# Altium PCB J-Link Cortex with VCOM Adapter.PcbDoc
Units mil, origin at the board's own origin, x right, y up, seen from the top; angles counter-clockwise.
Board outline 1320 x 990 mil, 2 copper layers (Top Layer, Bottom Layer), stack 61.756 mil thick; 23 components, 22 nets, 104 pads, 35 vias.
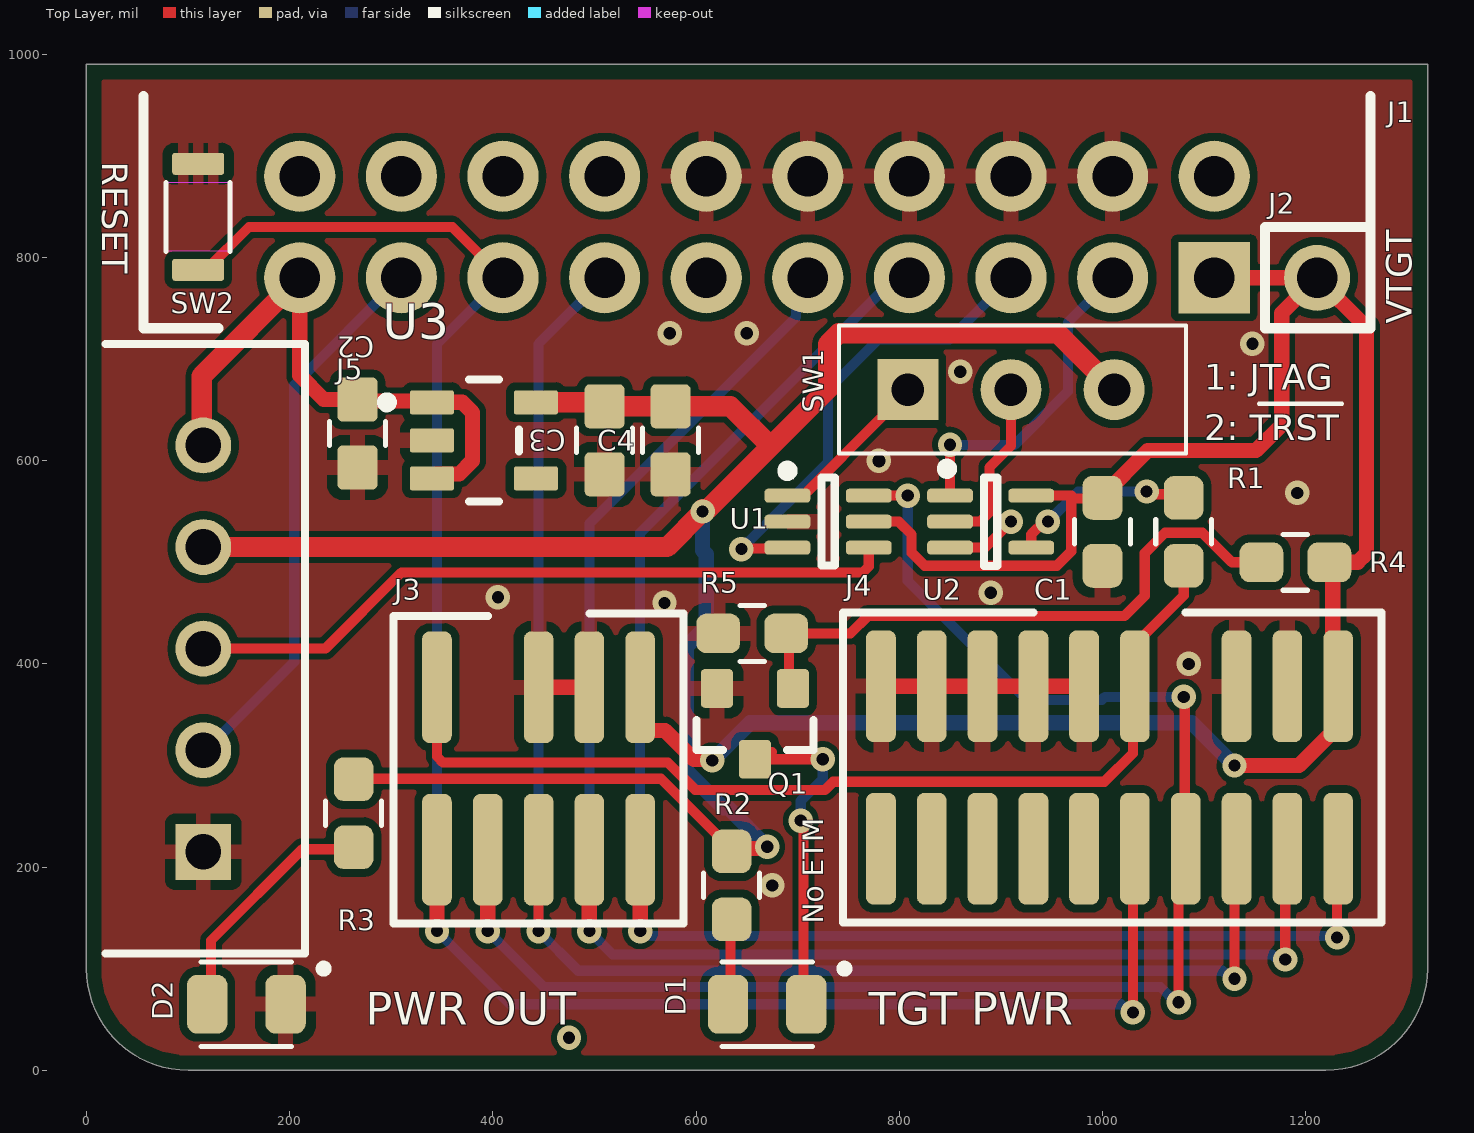
[diagram p0: Top Layer view]
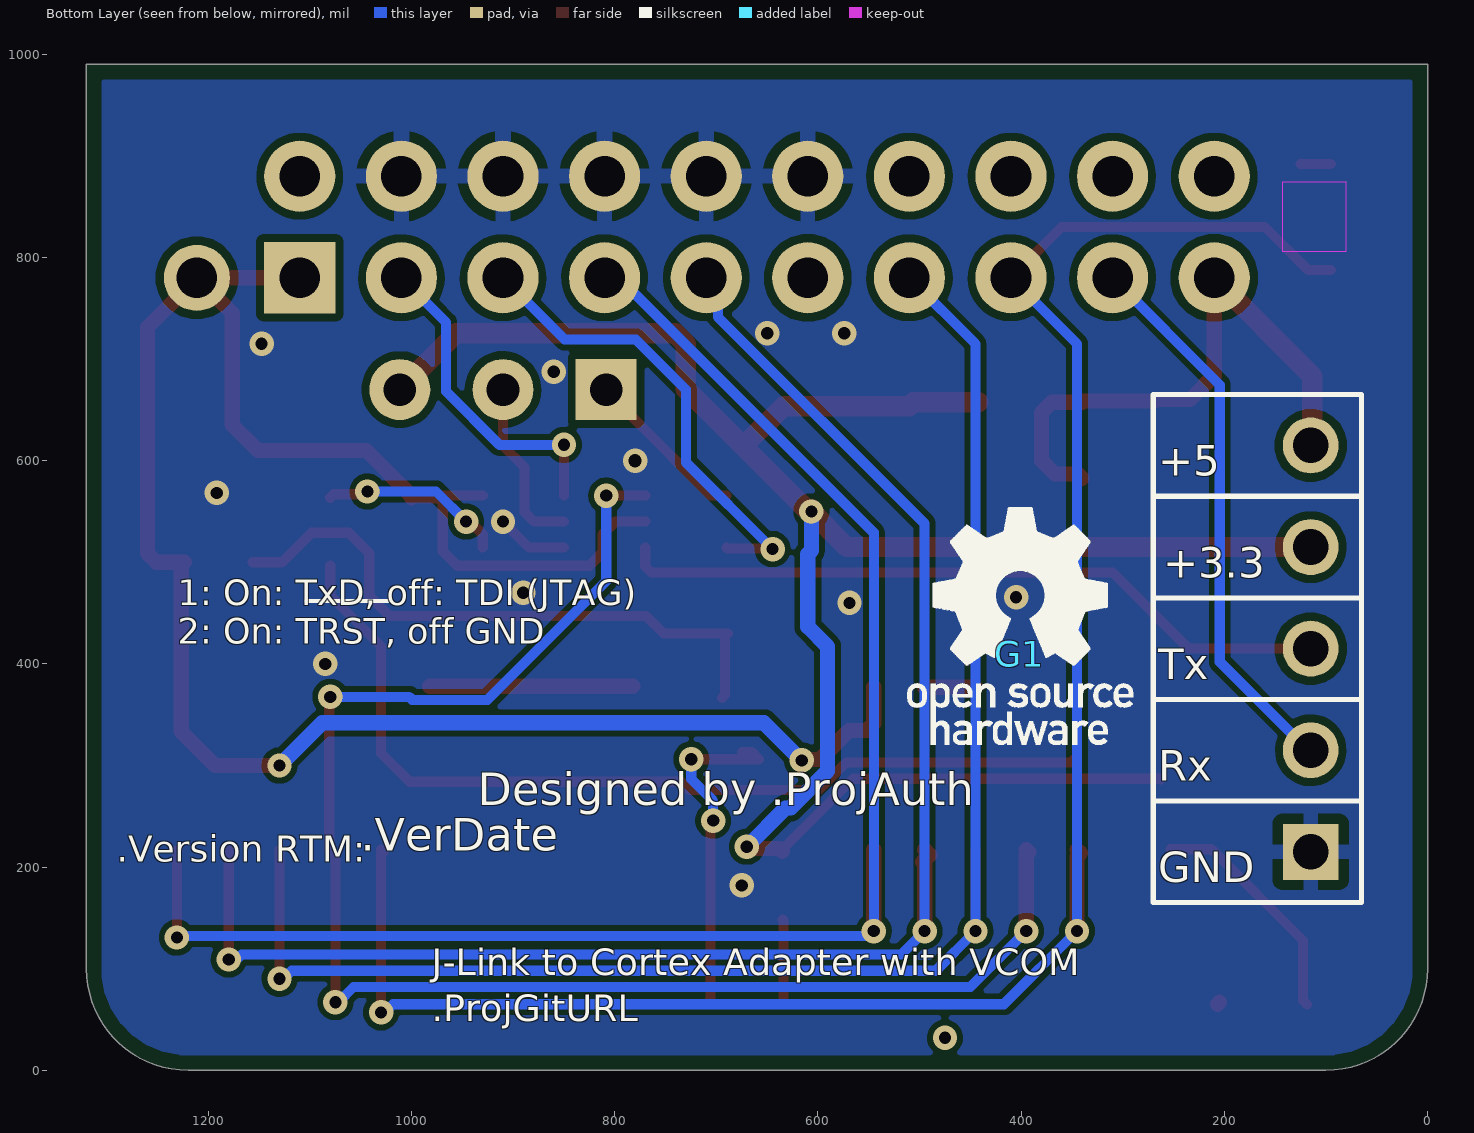
[diagram p1: Bottom Layer view, seen from below]
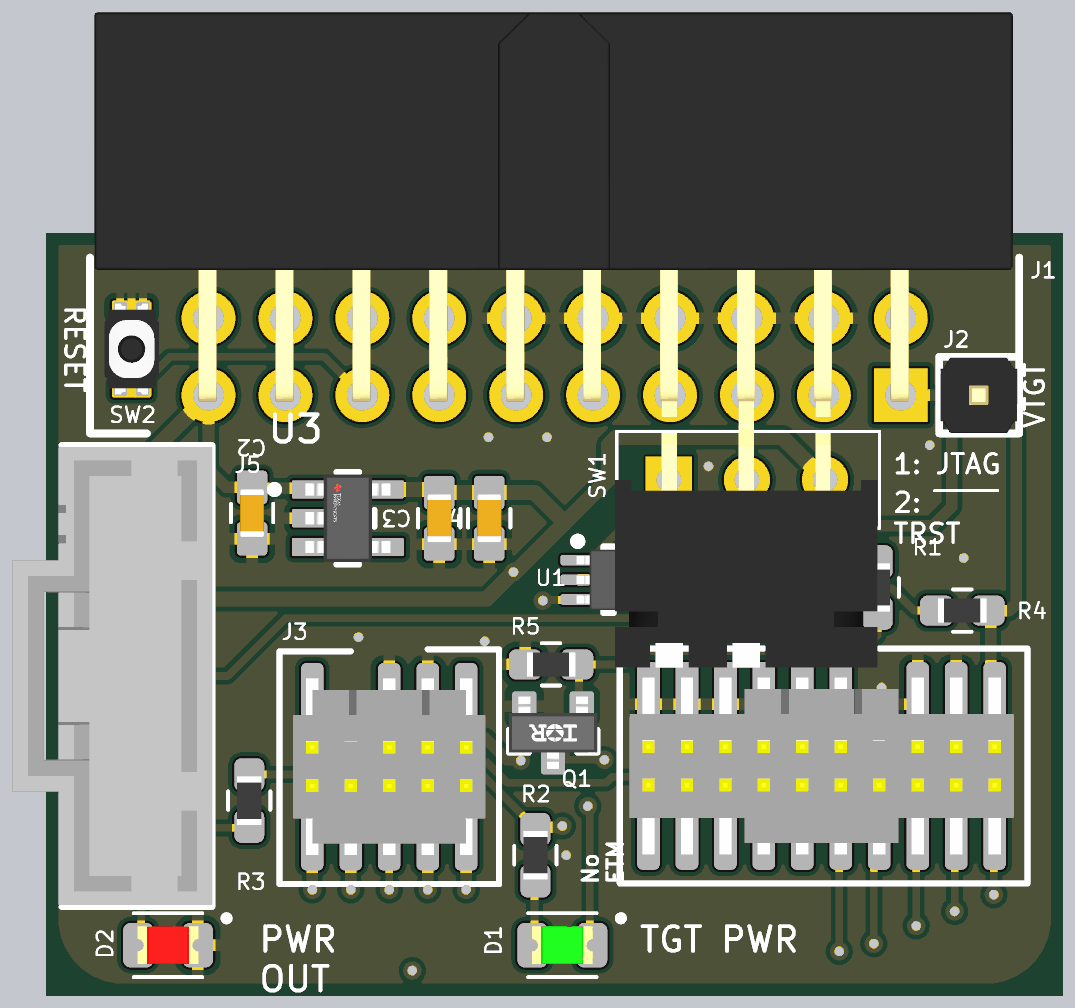
[diagram p2: 3D render of the assembled board from above, using the file's embedded part models]

## Layer stack, top to bottom
Top Solder: solder mask 1, PSR-4000BN, Dk 4.5
Top Layer: signal copper 1.378
Dielectric 1: core 59, Kingboard KB6167F, Dk 4.5
Bottom Layer: signal copper 1.378
Bottom Solder: solder mask 1, PSR-4000BN, Dk 4.5

## Board outline
0,100 ccw(c100,100) 100,0 300.72,0 1220,0 ccw(c1220,100) 1320,100 1320,990 0,990

## Design rules (kind name [scope] priority, off if disabled: settings)
AcuteAngle [All] p1: minimum=6.00000000000000E+0001 checktracksonly=FALSE
BoardOutlineClearance [All] p1: gap=15 ignorepadtopadclearanceinfootprint=FALSE
Clearance [All] p1: gap=6 ignorepadtopadclearanceinfootprint=FALSE except(8: SMDPad-Poly THPad-Poly; 12: Arc-Hole Track-Hole SMDPad-Hole THPad-Hole Via-Hole Fill-Hole Poly-Hole Region-Hole Text-Hole)
ComponentClearance [All] p1: gap=5 collisioncheckmode=3 verticalgap=5 showdistances=TRUE
Creepage [All] p1: checkdistance=3 ignoreinternallayers=FALSE
DiffPairsRouting [All] p1: maxlimit=10 minlimit=5 mostfreqgap=5 toplayer_minwidth=5 toplayer_maxwidth=1000 toplayer_prefwidth=5 bottomlayer_minwidth=5 bottomlayer_maxwidth=1000 bottomlayer_prefwidth=5 maxuncoupledlength=500
Height [All] p1: minheight=0 maxheight=71497.94 prefheight=500
HoleSize [All] p1: absolutevalues=TRUE maxlimit=248.03 minlimit=10 maxpercent=80.000 minpercent=20.000
HoleToHoleClearance [All] p1: gap=9.84 allowstackedmicrovias=FALSE
MinimumAnnularRing [All] p1: minimumring=3
MinimumSolderMaskSliver MinimumSolderMaskSliver_1 [All] p1: minsoldermaskwidth=0
MinimumSolderMaskSliver [HasFootprint('EVP-BB2A9B000 LOW DENSITY') vs HasFootprint('EVP-BB2A9B000 LOW DENSITY')] p2: minsoldermaskwidth=0
PasteMaskExpansion "THT Paste" [IsThruPin or IsThruVia or IsVia] p1: expansion=-99999 usepaste=FALSE
PasteMaskExpansion [All] p2: expansion=0
PlaneClearance [All] p1: clearance=5
PlaneConnect PlaneConnectPowerPads [InPadClass('PowerPads')] p1: planeconnectstyle=Direct reliefexpansion=20 reliefentries=4 reliefconductorwidth=10 reliefairgap=10
PlaneConnect [All] p2: pad.planeconnectstyle=Relief pad.reliefexpansion=11.81 pad.reliefentries=4 pad.reliefconductorwidth=5 pad.reliefairgap=5 via.planeconnectstyle=Direct via.reliefexpansion=11.81 via.reliefentries=4 via.reliefconductorwidth=5 via.reliefairgap=5
PolygonConnect PolygonConnectPowerPads [All vs InPolygonClass('PWRPLY')] p1: thpad.connectstyle=Relief thpad.reliefconductorwidth=15 thpad.reliefentries=4 thpad.polygonreliefangle="90 Angle" thpad.airgapwidth=10 smdpad.connectstyle=Relief smdpad.reliefconductorwidth=15 smdpad.reliefentries=4 smdpad.polygonreliefangle="90 Angle" smdpad.airgapwidth=10 via.connectstyle=Direct via.reliefconductorwidth=10 via.reliefentries=4 via.polygonreliefangle="90 Angle" via.airgapwidth=10
PolygonConnect [All] p2: thpad.connectstyle=Relief thpad.reliefconductorwidth=8 thpad.reliefentries=4 thpad.polygonreliefangle="90 Angle" thpad.airgapwidth=8 smdpad.connectstyle=Relief smdpad.reliefconductorwidth=5 smdpad.reliefentries=4 smdpad.polygonreliefangle="90 Angle" smdpad.airgapwidth=5 via.connectstyle=Direct via.reliefconductorwidth=5 via.reliefentries=4 via.polygonreliefangle="90 Angle" via.airgapwidth=5
RoutingCorners [All] p1: cornerstyle=45-Degree minsetback=250 maxsetback=100
RoutingVias [All] p1: holewidth=12 width=24 viastyle="Through Hole" minholewidth=10 minwidth=20 maxholewidth=23.62 maxwidth=259.84
SilkToSilkClearance [All] p1: silktosilkclearance=3
SilkToSolderMaskClearance [IsPad or IsVia] p1: minsilkscreentomaskgap=3 clearancetoexposedcopper=FALSE
SolderMaskExpansion TentedVias [IsVia] p1: expansion=4 istentingtop=TRUE
SolderMaskExpansion [All] p2: expansion=3 istentingtop=FALSE
SupplyNets "Schematic Supply Nets_3" [InNet('+5')] p1: voltage=0.000
SupplyNets "Schematic Supply Nets_2" [InNet('VREF_TGT')] p2: voltage=0.000
SupplyNets "Schematic Supply Nets_1" [InNet('+3.3')] p3: voltage=0.000
SupplyNets "Schematic Supply Nets" [InNet('GND')] p4: voltage=0.000
UnRoutedNet [All] p1: checkbadconnections=TRUE
Width PWRWIDTH [InNetClass('PWR')] p1: maxlimit=40 minlimit=10 preferedwidth=15 minimp=50.000000 maximp=50.000000 favimp=50.000000
Width [All] p2: maxlimit=1000 minlimit=6 preferedwidth=10 minimp=50.000000 maximp=50.000000 favimp=50.000000
17 further rules are at their usual default settings.

## Classes and differential pairs
polygon class PWRPLY: BOTGND TOPGND
net class PWR: +3.3 +5 GND

## Components (designator, comment, footprint, x,y, rotation, side; value= is the part's Value field where it differs from the comment)
C1 "CAP 0603 0.1UF 16V 10% X7R" 0603_CAP#1 1000,530 r270 top value=0.1UF
C2 "CAP 0603 1UF 50V 10% X7R" 0603_CAP#2 266.73,626.76 r90 top value=1µF
C3 "CAP 0603 1UF 50V 10% X7R" 0603_CAP#2 510,620 r90 top value=1µF
C4 "CAP 0603 1UF 50V 10% X7R" 0603_CAP#2 575,620 r90 top value=1µF
D1 "Green LED" SM0805GCL 670,65 r180 top
D2 "Red LED" SM0805HCL 157.4,65 r180 top
G1 "Comment" OSHW_.25in 401.62,410 r180 bottom
J1 "20 contact Female header, RA" SFH11-PBPC-D10-RA-BK 660,1110.31 r180 top locked
J2 "1 contacts Male header" "PH1-01-UA round pad with connector" 1211.3,780 r0 top
J3 "Cortex Debug, 0.050\" 10 Pin" "FTSH-105-01-F-DV-007-K PLUGOUT" 445,297.01 r180 top
J4 "Cortex Debug+ETM Connector, 0.050\" 20 Pin" "FTSH-110-01-F-DV-007-K plugout" 1007,298 r180 top
J5 "5-104363-4" 5-104363-4-Footprint-1 115,415 r90 top
Q1 "IRLML0040TRPBF" SOT95P237X112-3N-2-V 658,341 r270 top
R1 "RES 0603 10K 1%" 0603_RES 1080,530 r90 top value=10K
R2 "RES 0603 680 1%" 0603_RES 635,182.01 r90 top value=680
R3 "RES 0603 680 1%" 0603_RES 263,253.01 r90 top value=680
R4 "RES 0603 1K 1%" 0603_RES 1190,500 r180 top value=1K
R5 "RES 0603 10K 1%" 0603_RES 655.31,430 r0 top value=10K
SW1 "SWITCH SLIDE DIP SPST 10MA 20V" SPA02B 910,670 r0 top
SW2 "SWITCH TACTILE SPST-NO 0.02A 15V" "EVP-BB2A9B000 LOW DENSITY" 110,840 r90 top
U1 "Demultiplexer" SOT363 730,540 r0 top
U2 "Single AND Gate" SOT353 890,540 r0 top
U3 "TLV75533PDBVR" FP-DBV0005A-MFG 391.18,620 r0 top

## Footprints (in the part's own frame and the unit in brackets; to place one, negate y for a bottom-side part, rotate by r counter-clockwise, add the part's x,y. Pads: shape width x height; smd on the part's side, far side on the other; paste and mask are expansions set on the pad)
5-104363-4-Footprint-1 [mm]
  rect 1.398x1.398 hole 0.89: 1(-5.08,0)
  round 1.398 hole 0.89: 2(-2.54,0) 3(0,0) 4(2.54,0) 5(5.08,0)
  silkscreen extent -7.62,-2.54 7.62,2.44, body extent -7.56,-2.54 7.56,4.06, height 13.59
0603_CAP#1 [mm]
  rrect50% 1.1x1 smd: 1(-0.85,0) 2(0.85,0)
  silkscreen extent -0.3,-0.7 0.3,0.7, body extent -0.8,-0.4 0.8,0.4, height 0.6
0603_CAP#2 [mm]
  rrect25% 1.1x1 smd: 1(-0.85,0) 2(0.85,0)
  silkscreen extent -0.3,-0.7 0.3,0.7, body extent -0.8,-0.4 0.8,0.4, height 0.6
0603_RES [mil]
  rrect50% 43x39 smd: 1(-33.46,0) 2(33.46,0)
  silkscreen extent -12,-28 12,28, body extent -31,-16 32,16, height 24
"EVP-BB2A9B000 LOW DENSITY" [mm]
  rrect25% 0.55x0.55 smd paste-0.05: 1(-1.325,-0.375) 1(-1.325,0.375) 2(1.325,-0.375) 2(1.325,0.375)
  rrect25% 0.55x0.55 smd paste-999: 1(-1.325,0) 2(1.325,0)
  Keep-Out Layer region: 0.864,-0.84 -0.864,-0.84 -0.864,0.762 0.864,0.762
  silkscreen extent -0.86,-0.8 0.86,0.8, body extent -1.5,-0.9 1.5,0.9, height 0.54
FP-DBV0005A-MFG [mm]
  rrect17% 1.1x0.6 smd: 1(-1.3,0.95) 2(-1.3,0) 3(-1.3,-0.95) 4(1.3,-0.95) 5(1.3,0.95)
  silkscreen extent -2.55,-1.53 0.87,1.52, body extent -1.4,-1.45 1.4,1.45, height 1.45
"FTSH-105-01-F-DV-007-K PLUGOUT" [mil]
  rrect50% 29.13x109.84 smd: 1(-100,-80) 2(-100,80) 3(-50,-80) 4(-50,80) 5(0,-80) 6(0,80) 8(50,80) 9(100,-80) 10(100,80)
  silkscreen extent -143,-153 143,153, body extent -207,-115 207,310, height 315
"FTSH-110-01-F-DV-007-K plugout" [mil]
  rrect50% 29.13x109.84 smd: 1(-225,-80) 2(-225,80) 3(-175,-80) 4(-175,80) 5(-125,-80) 6(-125,80) 8(-75,80) 9(-25,-80) 10(-25,80)
  rrect50% 29.5x109.84 smd: 11(25,-80) 12(25,80) 13(75,-80) 14(75,80) 15(125,-80) 16(125,80) 17(175,-80) 18(175,80) 19(225,-80) 20(225,80)
  silkscreen extent -268,-153 262,153, body extent -333,-115 332,310, height 315
OSHW_.25in [mil]
  silkscreen extent -110,-90 112,144
"PH1-01-UA round pad with connector" [mil]
  round 65 hole 40: 1(0,0)
  silkscreen extent -51,-50 53,50, body extent -50,-50 50,50, height 1045
SFH11-PBPC-D10-RA-BK [mil] "CONN HDR 20POS 0.1 GOLD PCB R/A"
  rect 70x70 hole 40 paste-99999: 1(-450,330.31)
  round 70 hole 40 paste-99999: 2(-450,230.31) 3(-350,330.31) 4(-350,230.31) 5(-250,330.31) 6(-250,230.31) 7(-150,330.31) 8(-150,230.31) 9(-50,330.31) 10(-50,230.31) 11(50,330.31) 12(50,230.31) 13(150,330.31) 14(150,230.31) 15(250,330.31) 16(250,230.31) 17(350,330.31) 18(350,230.31) 19(450,330.31) 20(450,230.31)
  silkscreen extent -604,151 604,380, body extent -596,-167 598,338, height 280
SM0805GCL [mm]
  rrect50% 1.01x1.47 smd: A(0.98,0) K(-0.98,0)
  silkscreen extent -2.03,-1.05 1.13,1.05, body extent -1,-0.62 1,0.62, height 1.12
SM0805HCL [mm]
  rrect50% 1.01x1.47 smd: A(0.98,0) K(-0.98,0)
  silkscreen extent -2.03,-1.05 1.13,1.05, body extent -1,-0.62 1,0.62, height 1.12
SOT95P237X112-3N-2-V [mm] "SOT,0.95mm pitch;3 pin,1.30mm W X 2.92mm L X 1.12mm H body"
  rrect25% 0.972x0.802 smd paste+0 mask+0: 1(-0.885,0.95) 2(-0.885,-0.95) 3(0.885,0)
  silkscreen extent -0.1,-1.46 0.65,1.46, body extent -1.2,-1.46 1.2,1.46, height 1.12
SOT353 [mil]
  rrect50% 45x13.78 smd: 1(-40,25.59) 2(-40,0) 3(-40,-25.59) 4(40,-25.59) 5(40,25.59)
  silkscreen extent -48,-44 6,57, body extent -47,-43 47,43, height 43
SOT363 [mil]
  rrect50% 45x13.78 smd: 1(-40,25.59) 2(-40,0) 3(-40,-25.59) 4(40,-25.59) 5(40,0) 6(40,25.59)
  silkscreen extent -45,-43 6,55, body extent -41,-39 41,39, height 39
SPA02B [mil]
  rect 60x60 hole 32: 1(-101.58,0)
  round 60 hole 32: 2(0,0) 3(101.57,0)
  silkscreen extent -169,-63 172,63, body extent -169,-63 172,63, height 244

## Part data
C1: "Capacitor Surface Mount 0603 Footprint 0.1UF 16V 10% Tolerance Ceramic X7R", Manufacturer=Various, PCB Package=0603, Tolerance=10%, Voltage=16V, ComponentLink1Description="Manufacturer Website", ComponentLink2Description="Component Datasheet", ComponentLink3Description="Octopart Link", Description in Visual="Cap SMT 0603 0.1UF 16V 10%  Cer X7R", Manufacturer P/N=Various, P/N="CAP 0603 0.1UF 16V 10% X7R", Type="Ceramic X7R", Val=0.1UF, Vol=16V
C2 C3 C4: library part CMP-011-000287-4, "Capacitor Surface Mount 0603 Footprint 1UF 50V 10% Tolerance Ceramic X7R", Capacitor Type=Ceramic, Case/Package=0603, Manufacturer=Various, Tolerance=10%, Voltage=50V, Description in Visual="Cap SMT 0603 1UF 50V 10% Ceramic X7R", Manufacturer P/N="CAP 0603 1UF 50V 10% X7R", Mount=SMT, P/N="CAP 0603 1UF 50V 10% X7R", PCB Package=0603, RoHS=Yes, Type="Ceramic X7R"
D1: library part SM0805GCL, "Green 574nm LED Indication - Discrete 1.9V 0805 (2012 Metric)", Color=Green, Manufacturer=Bivar, Millicandela Rating=3.6mcd, Package Class="Surface Mount", PCB Package=0805, Test Current=2mA, Voltage Rating=1.9V, ComponentLink1Description="Manufacturer Website", ComponentLink1URL=#https://www.bivar.com/#, ComponentLink2Description="Component Datasheet", ComponentLink2URL=https://www.bivar.com/parts_content/Datasheets/SM0805HCL.pdf, ComponentLink3Description="Octopart Link", ComponentLink3URL=#https://octopart.com/sm0805gcl-bivar-22059573?r=sp#, Configuration=Single, Description in Visual="Green 574nm LED Indication - Discrete 1.9V 0805 (2012 Metric)", Lens Style=Square, Lens Type=Clear, Manufacturer P/N=SM0805GCL, P/N=SM0805GCL, Viewing Angle=130°, Wavelength=574nm
D2: library part SM0805HCL, "Red 631nm LED Indication - Discrete 1.9V 0805 (2012 Metric)", Color=Red, Manufacturer=Bivar, Millicandela Rating=11.5mcd, Package Class="Surface Mount", PCB Package=0805, Test Current=2mA, Voltage Rating=1.9V, ComponentLink1Description="Manufacturer Website", ComponentLink1URL=#https://www.bivar.com/#, ComponentLink2Description="Component Datasheet", ComponentLink2URL=https://www.bivar.com/parts_content/Datasheets/SM0805HCL.pdf, ComponentLink3Description="Octopart Link", ComponentLink3URL=#https://octopart.com/sm0805hcl-bivar-2191581?r=sp#, Configuration=Single, Description in Visual="Red 631nm LED Indication - Discrete 1.9V 0805 (2012 Metric)", Lens Style=Square, Lens Type=Clear, Manufacturer P/N=SM0805HCL, P/N=SM0805HCL, Viewing Angle=130°, Wavelength=631nm
J1: library part SFH11-PBPC-D10-RA-BK, "20 Position Header Connector  Through Hole, Right Angle", Manufacturer=Sullins, PCB Package="2x10 THT", Supplier Part Number 1=S9205-ND, ComponentLink1Description="Manufacturer Website", ComponentLink1URL=https://www.sullinscorp.com/, ComponentLink2Description="Component Datasheet", ComponentLink2URL=https://datasheet.ciiva.com/754/sfh11-pxxc-dxx-ra-xx11161-c-754566.pdf?src-supplier=Digi-Key, Description in Visual="Con Hdr Female 20 contacts horizontal 2X10 keyed", Manufacturer P/N=SFH11-PBPC-D10-RA-BK, Number of Contacts=20, Number of Rows=2, Orientation=horizontal, P/N=SFH11-PBPC-D10-RA-BK, Pitch="0.100\"", Supplier 1=Digi-Key
J2: library part PH1-01-UA, "Connector Male Header 1X1 vertical 1contact 0.100in pitch Gold finish TH", Manufacturer="Adam Tech", PCB Package="NON-STD TH", Supplier Part Number 1=2057-PH1-01-UA-ND, ComponentLink1Description="Manufacturer Website", ComponentLink1URL=http://www.adam-tech.com/, ComponentLink2Description="Component Datasheet", ComponentLink2URL=http://www.adam-tech.com/downloader.php?p=PH1-XX-UA.pdf, ComponentLink3Description="Octopart Link", ComponentLink3URL=https://octopart.com/ph1-01-ua-adam+tech-12701205?r=sp, Contact Finish="Gold Flash", Description in Visual="Con Hdr Male 1contacts vertical 1X1", Gender=Male, Manufacturer P/N=PH1-01-UA, Number of Contacts=1, Number of Rows=1, Orientation=vertical, P/N=PH1-01-UA, Pitch=0.100in, Supplier 1=Digi-Key
J3: library part "ARM Cortex Debug", "10 Pin Shrouded Header, 0.050\", Key Pin 7", Manufacturer=Samtech, Manufacturer P/N=Various, Supplier Part Number 1=SAM15640-ND, ComponentLink1Description="Pinout Reference", ComponentLink1URL=http://infocenter.arm.com/help/topic/com.arm.doc.faqs/attached/13634/cortex_debug_connectors.pdf, ComponentLink2Description="Datasheet for Connector", ComponentLink2URL=http://suddendocs.samtec.com/catalog_english/ftsh_smt.pdf, Contact Finish=Gold, Description in Visual="10 Pin Shrouded Header, 0.050\", Key Pin 7", Gender=Male, Number of Contacts=10, Number of Rows=2, Orientation=Vertical, P/N="ARM Cortex Debug", Pitch="0.050\"", Supplier 1=Digi-Key, Supplier 2=Digi-Key, Supplier 3=Digi-Key, Supplier Part Number 2=SAM13926CT-ND, Supplier Part Number 3=SAM11250-ND
J4: library part "Cortex Debug+ETM", "20 Pin Shrouded Header, 0.050\", Key Pin 7", Manufacturer=Samtech, Manufacturer P/N=Various, Supplier Part Number 1=SAM15422CT-ND, ComponentLink1Description="Pinout Reference", ComponentLink1URL=http://infocenter.arm.com/help/topic/com.arm.doc.faqs/attached/13634/cortex_debug_connectors.pdf, ComponentLink2Description="Datasheet for Connector", ComponentLink2URL=http://suddendocs.samtec.com/catalog_english/ftsh_smt.pdf, Contact Finish=Gold, Description in Visual="20 Pin Shrouded Header, 0.050\", Key Pin 7", Gender=Male, Number of Contacts=20, Number of Rows=2, Orientation=Vertical, P/N="Cortex Debug+ETM", Pitch="0.050\"", Supplier 1=Digi-Key, Supplier 2=Avnet, Supplier 3=Digi-Key, Supplier 4=Avnet, Supplier Part Number 2=FTSH-110-01-F-DV-007-K-TR, Supplier Part Number 3=SAM11264-ND, Supplier Part Number 4=FTSH-110-01-F-DV-007-K-A
J5: library part CMP-00107-1, "Board Connector, 5 Contact(s), 1 Row(s), Male, Straight, 0.1 inch Pitch, Solder Terminal, Locking, Black Insulator, Plug"
Q1: library part CMP-00070-5, "Power Field-Effect Transistor, 3.6A I(D), 40V, 0.056ohm, 1-Element, N-Channel, Silicon, Metal-oxide Semiconductor FET, TO-236AB", Drain Current-Max (Abs) (ID)=3.6A, Drain-source On Resistance-Max=56mR, DS Breakdown Voltage-Min=40V, Max Operating Temperature=150°C, Operating Mode="ENHANCEMENT MODE", Package Body Material=Plastic, Package Shape=Rectangular, Package Style="SMALL OUTLINEMeter", Peak Reflow Temperature (Cel)=260°C, Power Dissipation-Max (Abs)=1.3W, Pulsed Drain Current-Max (IDM)=15A, Time @ Peak Reflow Temperature-Max (s)=30s, Additional Feature="HIGH RELIABILITY", Drain Current-Max (ID)=3.6A, FET Technology="METAL-OXIDE SEMICONDUCTOR", JEDEC-95 Code=TO-236AB, JESD-30 Code=R-PDSO-G3, JESD-609 Code=e3, Moisture Sensitivity Level=1, Number of Elements=1, Pins=3, Polarity/Channel Type=N-CHANNEL, Qualification Status="Not Qualified", Reach SVHC Compliant=Yes, RoHS Compliant=Yes, Surface Mount=Yes, Terminal Finish=Tin, Terminal Form="Gull Wing", Terminal Position=DUAL, Transistor Application=SWITCHING, Transistor Element Material=SILICON
R1 R5: "Resistor Surface Mount, 10K Ohms, 0603 Footprint, 1% Tolerance 0.1W", Manufacturer=Various, PCB Package=0603, Power_Rating=0.1W, Supplier Part Number 1=P10.0KHCT-ND, Tolerance=1%, Description in Visual="Res SMT 10K 0603  1%  0.1W", Manufacturer P/N=Various, P/N="RES 0603 10K 1%", Supplier 1=Digi-Key, Supplier 2=Digi-Key, Supplier 3=Newark, Supplier 4=Digi-Key, Supplier Part Number 2=541-10.0KHCT-ND, Supplier Part Number 3=68R0128, Supplier Part Number 4=A106048CT-ND, Tol=1%, Val=10K
R2 R3: "Resistor Surface Mount, 680 Ohms, 0603 Footprint, 1% Tolerance 0.1W", Manufacturer=Various, PCB Package=0603, Power_Rating=0.1W, Supplier Part Number 1=541-680HCT-ND, Tolerance=1%, Description in Visual="Res SMT 680 0603  1%  0.1W", Manufacturer P/N=Various, P/N="RES 0603 680 1%", Supplier 1=Digi-Key, Supplier 2=Digi-Key, Supplier 3=Digi-Key, Supplier 4=Digi-Key, Supplier Part Number 2=2019-RK73H1JTTD6800FCT-ND, Supplier Part Number 3=P680HCT-ND, Supplier Part Number 4=YAG3356CT-ND, Tol=1%, Val=680
R4: "Resistor Surface Mount, 1K Ohms, 0603 Footprint, 1% Tolerance 0.1W", Manufacturer=Various, PCB Package=0603, Power_Rating=0.1W, Supplier Part Number 1=2019-RK73H1JTTD1001FCT-ND, Tolerance=1%, Description in Visual="Res SMT 1K 0603  1%  0.1W", Manufacturer P/N=Various, P/N="RES 0603 1K 1%", Supplier 1=Digi-Key, Supplier 2=Digi-Key, Supplier 3=RSComponents, Supplier 4=Digi-Key, Supplier Part Number 2=541-1166-1-ND, Supplier Part Number 3=1051155, Supplier Part Number 4=311-1.00KHRCT-ND, Tol=1%, Val=1K
SW1: library part SPA02B, "Dip Switch SPST 2 Position Through Hole Slide (Standard) Actuator 10mA 20VDC, Commoned", Manufacturer=C&K, Rated Current (A)=10mA, Rated Voltage (V)=20VDC, Supplier Part Number 1=CKN9438-ND, Temperature Range="-30°C ~ 60°C", Actuator Height=Flush/Recessed, ComponentLink1Description="Manufacturer's Website", ComponentLink1URL=https://www.ckswitches.com/, ComponentLink2Description="Component Datasheet", ComponentLink2URL=https://www.ckswitches.com/media/1325/spa.pdf, ComponentLink4Description="Octopart Link", ComponentLink4URL=https://octopart.com/spa02b-c%26k+components-7950389?r=sp, Contact Material="Beryllium Copper. Gold Finish", Electrical Life="1000 Cycles", Manufacturer P/N=SPA02B, Mechanical Life="1,000 Cycles", Mounting Style="Through Hole", Number of Switches=2, P/N=SPA02B, Supplier 1=Digi-Key, Switch Function="Off-On (Common)", Throw Configuration=2xSPST, Type=DIP
SW2: library part EVP-BB2A9B000, "Tactile Switch SPST-NO Top Actuated Surface Mount", Manufacturer="Panasonic Electronic Components", Rated Current (A)=20mA, Rated Voltage (V)=15VDC, Supplier Part Number 1=P19888CT-ND, Temperature Range="-40°C ~ 85°C", Actuation Force=160gf, Actuator Height=0.53mm, ComponentLink1Description="Manufacturer's Website", ComponentLink1URL=https://na.industrial.panasonic.com/, ComponentLink2Description="Component Datasheet", ComponentLink2URL=https://www3.panasonic.biz/ac/e_download/control/switch/light-touch/catalog/sw_lt_eng_2616s.pdf, ComponentLink4Description="Octopart Link", ComponentLink4URL=https://octopart.com/evp-bb2a9b000-panasonic-75477754?r=sp, Manufacturer P/N=EVP-BB2A9B000, Mechanical Life="500,000 Cycles", Mounting Style=SMD, Number of Switches=1, P/N=EVP-BB2A9B000, Supplier 1=Digi-Key, Switch Function=Off-Mom, Throw Configuration=SPST-NO, Type=Tactile
U1: library part SN74LVC1G18DCK, "Single 1-of-2 Non-Inverting Demultiplexer with 3-State Deselected Output SC70-6", Manufacturer="Texas Instruments", PCB Package=SC70-6, Supplier Part Number 1=296-15569-1-ND, Temp Range="-40 to +85 °C", ComponentLink1Description="Manufacturer Website", ComponentLink1URL=http://www.ti.com, ComponentLink2Description="Component Datasheet", ComponentLink3Description="Octopart Link", ComponentLink3URL=http://octopart.com/partsearch/#search/requestData&q=SN74LVC1G18DCK, Description in Visual="Logic IC SMT Non-Inverting Demux SC70-6", Manufacturer P/N=SN74LVC1G18DCK, Number of Gates=1, P/N=SN74LVC1G18DCK, Supplier 1=Digi-Key, Type=Demux, Vs (max) (V)=5.5, Vs (min) (V)=1.65
U2: library part SN74LVC1G08DCKR, "Single Positive-AND Gate SMT 2-Input SOT-353", Manufacturer="Texas Instruments", PCB Package=SOT353, Quiescent Current (typ) (mA)=0.010, Supplier Part Number 1=296-11602-1-ND, Temp Range="-40 to +125 °C", ComponentLink1Description="Manufacturer Website", ComponentLink1URL=http://www.ti.com, ComponentLink2Description="Component Datasheet", ComponentLink2URL=https://www.ti.com/lit/ds/symlink/sn74lvc1g08.pdf, ComponentLink3Description="Octopart Link", ComponentLink3URL=#https://octopart.com/sn74lvc1g08dckr-texas+instruments-464430?r=sp#, Description in Visual="Logic IC SMT Single AND Gate SOT-353", Manufacturer P/N=SN74LVC1G08DCKR, Number of Gate Inputs=2, Number of Gates=1, P/N=SN74LVC1G08DCKR, Supplier 1=Digi-Key, Type=AND, Vs (max) (V)=5.5, Vs (min) (V)=1.65
U3: library part CMP-00433-1, "Fixed Positive LDO Regulator, 3.3V, 0.238V Dropout, PDSO5", JESD-609 Code=e3, Moisture Sensitivity Level=1, Reach SVHC Compliant=Yes, Regulator Type="FIXED POSITIVE SINGLE OUTPUT LDO REGULATOR", RoHS Compliant=Yes, Terminal Finish=Tin

## Via types
v1: diameter 24, hole 12, Top Layer to Bottom Layer, tented both sides, 34 vias
v2: diameter 24, hole 13, Top Layer to Bottom Layer, tented both sides, 1 vias

## Nets (pads, with @x,y where several pads share a name; then routed paths per layer and width w, separated by ;. In a path a pad name is that pad's centre, name@x,y a point inside that pad or via, vN(x,y) a via of type N, cw(c..) or ccw(c..) an arc to the next point about the centre after c; other vN are vias at no path point)
+3.3: C3.2 C4.2 J5.4 R2.2 R3.2 SW1.3 U3.5 | length 2089.6
  Top Layer w10: R3.2 263,287.01 565.46,287.01 R2.2@632.22,220.25
  Top Layer w15: R2.2@635,217.47 R2.2 637.8,218.28 668.28,218.28 v1(670,220)
  Top Layer w20: J5.4 571.45,515 v1(606.45,550) ; U3.5 506.06,657.4 C3.2 C4.2 633.89,653.47 673.35,614.01 ; v1@606.45,548.58 v1@606.45,552.44 ; v1@612.61,553.27 673.35,614.01 ; SW1.3 956.17,725.39 740.54,725.39 730,714.85 730,670.67 673.35,614.01
  Bottom Layer w15: v1(606.45,550) 606.45,511.55 610,508 610,436.52 590.5,417.02 590.5,294.44 626.86,258.08 631.92,258.08 v1(670,220)
+5: C2.2 J1.19 J5.5 U3.1 U3.3 | length 569.2
  Top Layer w15: J1.19 210,683.78 233.55,660.23 C2.2 268.15,658.81 338.59,658.81 U3.1 370,657.4 380,647.4 380,600 366.91,586.91 344.31,586.91 U3.3
  Top Layer w20: J5.5@113.34,626.76 113.34,683.34 J1.19
\RESET: J1.15 J3.10 J4.10 SW2.1 | length 1980.7
  Top Layer w10: SW2.1@95.24,787.83 117.83,787.83 160,830 360,830 J1.15 ; v1(1030,57.01) 1030,212.18 1027.59,214.6 J4.10@1030,217.01
  Top Layer w15: v1@345,142.01 345,210.51 341.75,213.76 J3.10
  Bottom Layer w10: J1.15 345,715 v1(345,137.01) 417.01,65 1018.22,65 1026.21,57.01 v1(1030,57.01)
\TRST: J1.3 U2.1 | length 317.9
  Top Layer w10: U2.1 v1(850,615.59)
  Bottom Layer w10: v1(850,615.59) 913.57,615.59 966,668.02 966,736 J1.3
GND: C1.2 C2.1 C3.1 C4.1 D2.K J1.4 J1.6 J1.8 J1.10 J1.12 J3.3 J3.5 J4.3 J4.5 J4.11 J4.13 J4.15 J4.17 J4.19 J5.1 Q1.2 R5.1 SW2.2 U1.2 U2.3 U3.2 | length 353
  Top Layer w10: SW2.2@95.24,892.17 SW2.2@124.76,892.17 ; U2.3 884.41,514.41 v1(910,540)
  Top Layer w15: D2.K@204.8,67.01 D2.K@206.81,65 ; J3.5 J3.3 ; J4.19 J4.17 J4.15 J4.13 J4.11
  other v1: 675,182.01 1085,400 569,460 405,465.5 890,470 1191.79,568.33 860,687.5 1147.56,715 574.08,725.39 650,725.39
  other v2: 780,600
NetD1_A: D1.A R2.1 | length 82.5
  Top Layer w10: D1.A@632.6,67.01 633.8,68.21 633.8,147.34 R2.1
NetD1_K: D1.K Q1.3 | length 336.1
  Top Layer w10: 674.64,313.43 665.27,313.43 Q1.3 724.59,306.16 v1(724.64,306.1) ; v1(703.14,245.74) 705.82,243.06 705.82,68.59 D1.K@707.4,67.01
  Bottom Layer w10: v1(703.14,245.74) 703.14,265.15 724.64,286.65 v1(724.64,306.1)
NetD2_A: D2.A R3.1 | length 231.8
  Top Layer w10: D2.A 122.68,68.86 122.68,127.68 212.54,217.54 R3.1@253,217.54
NetQ1_1: Q1.1 R4.2 R5.2 | length 611.1
  Top Layer w10: Q1.1@694.33,366.57 691.55,369.35 691.55,427.23 R5.2 752.08,430 769.08,447 1021.51,447 1041.58,467.07 1041.58,508.96 1061.66,529.04 1098.34,529.04 1127.38,500 R4.2
NetR1_2: R1.2 U2.4 | length 183.1
  Top Layer w10: U2.4 930,527.47 942.53,540 v1(946.31,540) ; v1(1043.46,569.63) 1046.13,566.95 1076.51,566.95 R1.2
  Bottom Layer w10: v1(946.31,540) 975.95,569.63 v1(1043.46,569.63)
PIN9: J3.9 J4.9 R1.1 | length 986.9
  Top Layer w10: J3.9 345,308.87 350.86,303.01 572.09,303.01 599.08,276.02 727.09,276.02 734.99,283.92 1001.91,283.92 1030,312.01 1030,417.36 1080,467.36 R1.1
RCLK: J1.11
Rx: J1.17 J5.2 | length 544
  Bottom Layer w10: J5.2@113.34,326.76 129.29,326.76 204.5,401.97 204.5,674.5 J1.17
SWDCLK: J1.9 J3.4 J4.4 | length 1612.4
  Top Layer w10: v1(1180,109.01) J4.4@1180,217.01
  Top Layer w15: v1@495,147.01 495,203.01 497,205.01 490,212.01 J3.4
  Bottom Layer w10: J1.9 698.52,768.52 698.52,741.39 495,537.87 v1(495,137.01) 518,114.01 1167.14,114.01 1169.46,111.69 1177.32,111.69 v1(1180,109.01)
SWDIO: J1.7 J3.2 J4.2 | length 1611.3
  Top Layer w10: J4.2@1230,217.01 1230.98,216.03 v1(1230.98,130.67)
  Top Layer w15: v1@545,142.01 J3.2
  Bottom Layer w10: J1.7 795.94,780 545,529.06 v1(545,137.01) 548.79,137.01 553.79,132.01 1229.64,132.01 v1(1230.98,130.67)
SWO: J1.13 J3.6 J4.6 | length 1581.4
  Top Layer w10: v1(444.99,137.01) J3.6 ; v1(1130,90.01) J4.6@1130,217.01
  Bottom Layer w10: J1.13 444.99,714.99 v1(444.99,137.01) 483.99,98.01 1118.21,98.01 1126.21,90.01 v1(1130,90.01)
T\R\S\T\_EN: SW1.2 U2.2 | length 172.1
  Top Layer w10: U2.2 879.5,540 888.74,549.24 888.74,593.23 910,614.5 SW1.2
TDI: J3.8 J4.8 U1.6 | length 1538.2
  Top Layer w10: U1.6 v1(808.43,565.59) ; v1(1075,67.01) 1075,212.01 1081,218.01 1081,366.5 v1(1080,367.5)
  Top Layer w15: v1(395,137.01) 395,212.01 392.5,214.51 J3.8
  Bottom Layer w10: v1(395,137.01) 450,82.01 1057.14,82.01 1072.14,67.01 v1(1075,67.01) ; v1(808.43,565.59) 808.43,481.57 925.51,364.49 999.36,364.49 1002.37,367.5 v1(1080,367.5)
Tx: J5.3 U1.4 | length 707
  Top Layer w10: J5.3 235,415 310,490 764.14,490 770,495.86 U1.4
Tx/TDI: J1.5 U1.3 | length 463.8
  Top Layer w10: v1(644.66,513) 645.37,513.7 689.3,513.7 U1.3
  Bottom Layer w10: v1(644.66,513) 730,598.34 730,670 779.26,719.26 849.26,719.26 J1.5
TxOrTDI: SW1.1 U1.1 | length 162.6
  Top Layer w10: U1.1 705.61,565.59 783.42,643.4 783.42,645 SW1.1
VREF_TGT: C1.1 J1.1 J2.1 J3.1 J4.1 R4.1 U1.5 U2.5 | length 2102.2
  Top Layer w10: U1.5 799.5,540 812.23,527.27 812.23,509.25 824.96,496.52 955.04,496.52 969.31,510.8 969.31,562.61 999.14,562.61 C1.1 ; U2.5 969.31,565.59
  Top Layer w15: J3.1 545,341.55 552.07,334.49 569.51,334.49 598.1,305.9 615.1,305.9 v1(616,305) ; C1.1 1000,565.43 1044.57,610 1151.21,610 1176.47,635.26 1176.47,745.17 J2.1 ; J1.1 J2.1 ; v1(1130,300) 1193.35,300 1226.73,333.39 1226.73,496.73 R4.1 1251.21,500 1260,508.79 1260,731.3 J2.1
  Bottom Layer w15: v1(616,305) 653,342 1088,342 v1(1130,300)
pads on no net: J1.2 J1.14 J1.16 J1.18 J1.20 J4.12 J4.14 J4.16 J4.18 J4.20 U3.4
copper on no net:
  other v1: 475,32.01

## Polygon pours and split planes (outlines as drawn)
GND on Bottom Layer "BOTGND" (solid, remove dead copper, pour order 9): 0,100 ccw(c100,100) 100,0 300.72,0 1220,0 ccw(c1220,100) 1320,100 1320,990 0,990
GND on Top Layer "TOPGND" (solid, remove dead copper, pour order 8): 0,100 ccw(c100,100) 100,0 300.72,0 1220,0 ccw(c1220,100) 1320,100 1320,990 0,990

## Silkscreen, mask and mechanical layers (free items; w line width, h text height)
Top Overlay:
  lines w4: 1154,656 1236,656
  text "RESET" at 15.5,894.23 h25 r270
  text "VTGT" at 1304.5,734.94 h25 r90
  text "1: JTAG" at 1100,670 h25
  text "2: TRST" at 1100,620 h25
  text "No ETM" at 725,144.33 h20 r90
  text "PWR OUT" at 275,45.01 h32
  text "TGT PWR" at 770,45.01 h32
Bottom Overlay:
  lines w4: 1023,462 1104,462
  lines w5: 65,265 65,365 ; 65,265 65,165 270,165 270,265 ; 65,265 270,265 ; 65,365 65,465 ; 65,365 270,365 ; 65,465 65,565 ; 65,465 270,465 ; 65,565 65,665 270,665 270,565 ; 65,565 270,565 ; 270,265 270,365 ; 270,365 270,465 ; 270,465 270,565
  text "+5" at 265,585 h30
  text "+3.3" at 260,485 h30
  text "1: On: TxD, off: TDI (JTAG) / 2: On: TRST, off GND" at 1230,420 h25
  text "Tx" at 265,385 h30
  text "Rx" at 265,285 h30
  text "Designed by .ProjAuth" at 935,250 h55
  text ".VerDate" at 1050,205 h55
  text ".Version RTM:" at 1290,205 h26
  text "GND" at 265,185 h30
  text "J-Link to Cortex Adapter with VCOM / .ProjGitURL" at 980,39.58 h45
Board Outline:
  the board outline again, w1
CAM Title Block:
  drawing of 59 lines, arcs and shapes, not listed
  text "1" at -578.29,5306.6 h48.36
  text "2" at 2164.83,5306.6 h48.36
  text "3" at 4917.96,5306.6 h48.36
  text "4" at 7663.58,5306.6 h48.36
  text "A" at -1851.46,4344.46 h48.36
  text "A" at 8949.26,4344.46 h48.36
  text "B" at -1846.46,2219.25 h48.36
  text "B" at 8953.43,2219.25 h48.36
  text "C" at 8952.6,94.88 h48.36
  text "C" at -1842.3,84.88 h48.36
  text "D" at -1849.8,-2030.33 h48.36
  text "D" at 8950.1,-2030.33 h48.36
  text "Title:" at 5360.69,-2111.2 h65.87
  text "'.Pcb_File_Name_No_Path'" at 5710.88,-2111.2 h63.36
  text "Adapter for Segger J-Link to Cortex" at 5610.83,-2209.17 h32.52
  text "Also adds VCOM UART support, 3.3V LDO, and breakouts for power and ground" at 5610.83,-2269.2 h32.52
  text "Desc:" at 5360.69,-2297.96 h42.52
  text "*" at 5610.83,-2345.48 h32.52
  text ".ProjAuth" at 6220.5,-2489.5 h42.52
  text "Letter" at 5560.8,-2493.06 h42.52
  text "Auth:" at 5961.01,-2493.06 h42.52
  text "Proj:" at 7060.76,-2493.06 h42.52
  text "Size:" at 5360.69,-2498.06 h42.52
  text ".ProjShrtName" at 7261.5,-2514.5 h42.52
  text "1" at 7360.92,-2632.71 h37.52
  text "1" at 7661.08,-2632.71 h37.52
  text "Date:" at 5360.69,-2638.96 h37.52
  text "'.ModifiedDate'" at 5610.83,-2638.96 h37.52
  text "Time:" at 6361.22,-2638.96 h37.52
  text "'.ModifiedTime'" at 6571.34,-2638.96 h37.52
  text "Sheet" at 7060.76,-2638.96 h37.52
  text "of" at 7511,-2638.96 h37.52
  text ".ProjGitURL" at 5611.5,-2717 h37.52
  text "Repo:" at 5360.69,-2729 h37.52
  text "File:" at 5360.69,-2829.05 h37.52
  text "'.Pcb_File_Name'" at 5610.83,-2829.05 h37.52
  text "1" at -578.29,-2992.47 h48.36
  text "2" at 2164.83,-2992.47 h48.36
  text "3" at 4917.96,-2992.47 h48.36
  text "4" at 7663.58,-2992.47 h48.36
Drill Drawing:
  lines w8: 4514.84,-1791.87 4523.17,-1791.87 4531.51,-1800.2 4539.84,-1791.87 4548.17,-1791.87 4539.84,-1783.54 4548.17,-1775.2 4539.84,-1775.2 4531.51,-1766.87 4523.17,-1775.2 4514.84,-1775.2 4523.17,-1783.54 4514.84,-1791.87 ; 4514.84,-1725.2 4514.84,-1716.87 4523.17,-1708.54 4514.84,-1700.2 4514.84,-1691.87 4523.17,-1691.87 4531.51,-1700.2 4539.84,-1691.87 4548.17,-1691.87 4548.17,-1700.2 4539.84,-1708.54 4548.17,-1716.87 4548.17,-1725.2 4539.84,-1725.2 4531.51,-1716.87 4523.17,-1725.2 4514.84,-1725.2 ; 4514.84,-1650.2 4531.51,-1641.87 4548.17,-1650.2 4539.84,-1633.54 4548.17,-1616.87 4531.51,-1625.2 4514.84,-1616.87 4523.17,-1633.54 4514.84,-1650.2 ; 4514.84,-1541.87 4548.17,-1541.87 4531.51,-1575.2 4514.84,-1541.87 ; 4514.84,-1500.2 4548.17,-1500.2 4548.17,-1466.87 4514.84,-1466.87 4514.84,-1500.2
  lines w15: 4484.01,-1822.7 8631.5,-1822.7 ; 4484.01,-1447.7 8631.5,-1447.7 ; 4769.05,-1897.7 4769.05,-1372.7 ; 5044.98,-1897.7 5044.98,-1372.7 ; 5600.82,-1897.7 5600.82,-1372.7 ; 6151.26,-1897.7 6151.26,-1372.7 ; 6413.8,-1897.7 6413.8,-1372.7 ; 6790.3,-1897.7 6790.3,-1372.7 ; 7546.08,-1897.7 7546.08,-1372.7 ; 7850.6,-1897.7 7850.6,-1372.7 ; 8233.1,-1897.7 8233.1,-1372.7 ; 4484.01,-1897.7 8631.5,-1897.7 8631.5,-1372.7 4484.01,-1372.7 4484.01,-1897.7
  text "Symbol" at 4529.01,-1425.2 h36
  text "Count" at 4791.55,-1425.2 h36
  text "Hole Size" at 5067.48,-1425.2 h36
  text "Hole Tolerance" at 5623.32,-1425.2 h36
  text "Plated" at 6173.76,-1425.2 h36
  text "Hole Type" at 6436.3,-1425.2 h36
  text "Drill Layer Pair" at 6812.8,-1425.2 h36
  text "Via/Pad" at 7568.58,-1425.2 h36
  text "Pad Shape" at 7873.1,-1425.2 h36
  text "Template" at 8255.6,-1425.2 h36
  text "1" at 4791.55,-1500.2 h30
  text "13.00mil (0.330mm)" at 5067.48,-1500.2 h30
  text "PTH" at 6173.76,-1500.2 h30
  text "Round" at 6436.3,-1500.2 h30
  text "Top Layer - Bottom Layer" at 6812.8,-1500.2 h30
  text "Via" at 7568.58,-1500.2 h30
  text "Rounded" at 7873.1,-1500.2 h30
  text "v61h33" at 8255.6,-1500.2 h30
  text "3" at 4791.55,-1575.2 h30
  text "32.00mil (0.813mm)" at 5067.48,-1575.2 h30
  text "PTH" at 6173.76,-1575.2 h30
  text "Round" at 6436.3,-1575.2 h30
  text "Top Layer - Bottom Layer" at 6812.8,-1575.2 h30
  text "Pad" at 7568.58,-1575.2 h30
  text "(Mixed)" at 7873.1,-1575.2 h30
  text "(Mixed)" at 8255.6,-1575.2 h30
  text "5" at 4791.55,-1650.2 h30
  text "35.04mil (0.890mm)" at 5067.48,-1650.2 h30
  text "PTH" at 6173.76,-1650.2 h30
  text "Round" at 6436.3,-1650.2 h30
  text "Top Layer - Bottom Layer" at 6812.8,-1650.2 h30
  text "Pad" at 7568.58,-1650.2 h30
  text "(Mixed)" at 7873.1,-1650.2 h30
  text "(Mixed)" at 8255.6,-1650.2 h30
  text "21" at 4791.55,-1725.2 h30
  text "40.00mil (1.016mm)" at 5067.48,-1725.2 h30
  text "PTH" at 6173.76,-1725.2 h30
  text "Round" at 6436.3,-1725.2 h30
  text "Top Layer - Bottom Layer" at 6812.8,-1725.2 h30
  text "Pad" at 7568.58,-1725.2 h30
  text "(Mixed)" at 7873.1,-1725.2 h30
  text "(Mixed)" at 8255.6,-1725.2 h30
  text "34" at 4791.55,-1800.2 h30
  text "12.00mil (0.305mm)" at 5067.48,-1800.2 h30
  text "PTH" at 6173.76,-1800.2 h30
  text "Round" at 6436.3,-1800.2 h30
  text "Top Layer - Bottom Layer" at 6812.8,-1800.2 h30
  text "Via" at 7568.58,-1800.2 h30
  text "Rounded" at 7873.1,-1800.2 h30
  text "v61h30m0mx0" at 8255.6,-1800.2 h30
  text "64 Total" at 4791.55,-1875.2 h30
Fab Notes:
  drawing of 416 lines, arcs and shapes, not listed
  text "Fab Design Rule Set: OSHPark" at 6177.83,1513.03 h55
  text "Layer" at 6211.63,1422.01 h30
  text "Name" at 6422.59,1422.01 h30
  text "Material" at 7093.4,1422.01 h30
  text "Thickness" at 7659.24,1422.01 h30
  text "Constant" at 7990.15,1422.01 h30
  text "Board Layer Stack" at 8281.09,1422.01 h30
  text "Top Overlay" at 6422.59,1362.01 h30
  text "Top Solder" at 6422.59,1302.01 h30
  text "PSR-4000BN" at 7093.4,1302.01 h30
  text "1.00mil" at 7659.24,1302.01 h30
  text "4.5" at 7990.15,1302.01 h30
  text "Top Surface Finish" at 6422.59,1242.01 h30
  text "Nickel, Gold" at 7093.4,1242.01 h30
  text "0.16mil" at 7659.24,1242.01 h30
  text "1" at 6211.63,1182.01 h30
  text "Top Layer" at 6422.59,1182.01 h30
  text "CF-004" at 7093.4,1182.01 h30
  text "1.38mil" at 7659.24,1182.01 h30
  text "Dielectric 1" at 6422.59,1122.01 h30
  text "Kingboard KB6167F" at 7093.4,1122.01 h30
  text "59.00mil" at 7659.24,1122.01 h30
  text "4.5" at 7990.15,1122.01 h30
  text "2" at 6211.63,1062.01 h30
  text "Bottom Layer" at 6422.59,1062.01 h30
  text "CF-004" at 7093.4,1062.01 h30
  text "1.38mil" at 7659.24,1062.01 h30
  text "Bottom Surface Finish" at 6422.59,1002.01 h30
  text "Nickel, Gold" at 7093.4,1002.01 h30
  text "0.16mil" at 7659.24,1002.01 h30
  text "Bottom Solder" at 6422.59,942.01 h30
  text "PSR-4000BN" at 7093.4,942.01 h30
  text "1.00mil" at 7659.24,942.01 h30
  text "4.5" at 7990.15,942.01 h30
  text "Bottom Overlay" at 6422.59,882.01 h30

## Text inside footprints (layer, text, board x,y; h text height)
C1: Librarian Notes "SS 102512, ADDED SILKSCREEN." at 1026,588 h1 r270
J1: Designer Notes "Recommended Edge" at 1755,995.31 h30 r180
R1: Librarian Notes "SS 102512, ADDED SILKSCREEN." at 1054,473 h1 r90
R2: Librarian Notes "SS 102512, ADDED SILKSCREEN." at 609,125.01 h1 r90
R3: Librarian Notes "SS 102512, ADDED SILKSCREEN." at 237,196.01 h1 r90
R4: Librarian Notes "SS 102512, ADDED SILKSCREEN." at 1247,474 h1 r180
R5: Librarian Notes "SS 102512, ADDED SILKSCREEN." at 598.31,456 h1
SW1: Top Component Outline "2" at 896.09,548.5 h25; Top Component Outline "1" at 801.45,548.5 h25
U1: Librarian Notes "2. JB 121812 CORRECTED COURTYARD OUTLINE TO SPACEX STANDARDS." at 703,594 h1; Librarian Notes "FOOTPRINT HISTORY" at 703,598 h1; Librarian Notes "1. MT 011410, COPIED F/P FROM DCK-6 AT TEXAS INSTRUMENTS LIBRARY." at 703,596 h1
U2: Librarian Notes "HISTORY: MT 031810, CREATED USING ON SEMICONDUCTOR CASE 419-02  COMP DWG." at 821,490.5 h1; Librarian Notes "LOCATION:SOT.PCBLIB" at 821,492.5 h1